# Altium PCB ePBR23_ACU_Power_rev0.PcbDoc (part 2 of 4)
Units mil, origin at the board's own origin, x right, y up, seen from the top; angles counter-clockwise.
Board outline 8165 x 3858 mil, 2 copper layers (Top Layer, Bottom Layer); 138 components, 121 nets, 515 pads, 2055 vias.
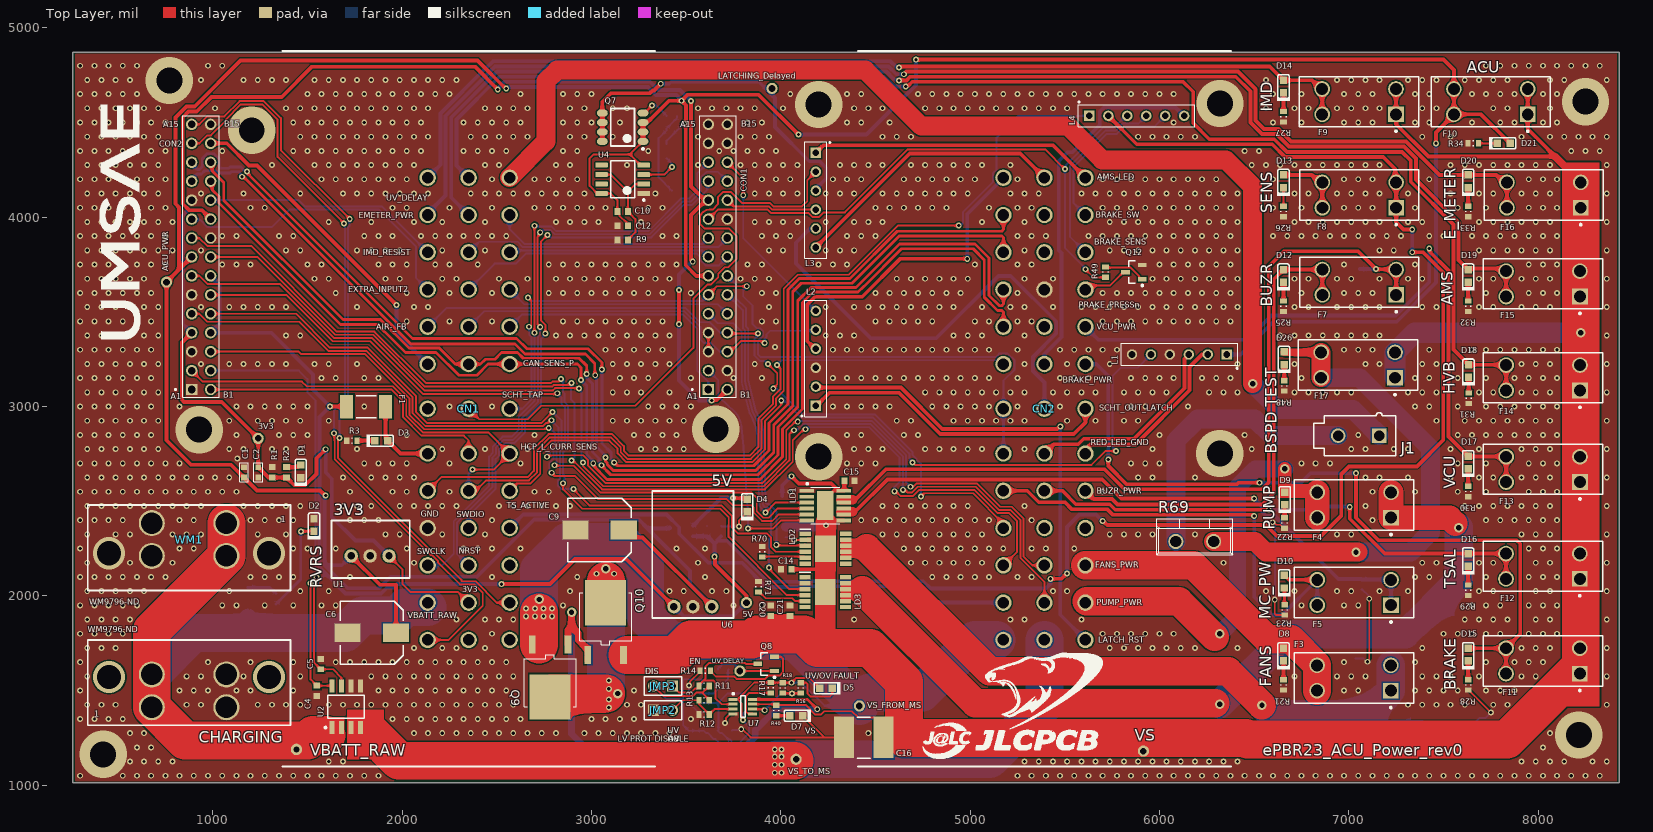
[diagram p0: Top Layer view]

## Via types
v1: diameter 31, hole 17, Top Layer to Bottom Layer, 2028 vias
v2: diameter 50, hole 28, Top Layer to Bottom Layer, 12 vias
v3: diameter 250, hole 137, Top Layer to Bottom Layer, 11 vias
v4: diameter 170, hole 128, Top Layer to Bottom Layer, 4 vias

## Nets (pads, with @x,y where several pads share a name; then routed paths per layer and width w, separated by ;. In a path a pad name is that pad's centre, name@x,y a point inside that pad or via, vN(x,y) a via of type N, cw(c..) or ccw(c..) an arc to the next point about the centre after c; other vN are vias at no path point) (continued)
5V: (continued)
  Top Layer w20: v1(1620,3000) F1.1@1707.05,3000 ; U2.8@1627.2,1549.69 1630,1546.89 U2.8@1630,1525.24 ; v1@2525,2063 2781.61,2063 2913.62,2195.01 3183.99,2195.01 U6.3@3436,1943 ; v1(3650.75,2207.11) 3652.86,2205.01 3652.86,2166.15 3818.72,2000.29 5V.1@3818.72,1964.38 ; v1(5425,2090) 5481.02,2090 5509.02,2118 v1(5512,2118) ; v1(5700,2395) 5702.98,2395 5723.98,2374 6562.75,2374 6619.75,2317 6853.01,2317 6960.5,2424.49 6960.5,2643.5 7000.5,2683.5 7359.5,2683.5 7499,2823 7499,3707.82 7391.82,3815 v1(7335,3815) ; L4.2@5730,4535 5880,4385 6595.45,4385 6662.45,4318 7182,4318 7244.8,4255.2 7244.8,4188.94 F8.2@7249.88,4183.86 F8.1@7249.88,4050 7249.88,3975.12 7289.5,3935.5 7334.5,3935.5 v1(7335,3935)
  Bottom Layer w10: v1(1517,2067) 1518.7,2068.7 1557.05,2068.7 1576.78,2088.43 1576.78,2097.98 1596.5,2117.7
  Bottom Layer w20: CON2.B7@989,3690 1036.12,3642.88 1036.12,3437.12 CON2.B4@989,3390 1310,3390 1530,3170 1530,3090 v1(1620,3000) 1564,2944 1564,2150.2 1596.5,2117.7 1701.2,2013 1890,2013 1919.57,2042.57 1953.25,2042.57 1967.61,2056.92 1972.69,2062 v1(2525,2062) ; U6.3@3436,1943 3488.43,1890.57 3744.91,1890.57 5V.1@3818.72,1964.38 ; R10.1@3535,2314.94 3611.97,2314.94 3650.75,2276.16 v1(3650.75,2207.11) ; 3650.75,2273.75 3668.52,2291.52 3716.77,2291.52 3933.79,2074.5 4141.04,2074.5 4144,2077.46 4752.83,2077.46 4790.73,2039.56 5399.56,2039.56 5425,2065 v1(5425,2090) ; 3665.02,2295.02 C13.2@3685,2315 ; v1(5512,2118) 5511.56,2118.44 5511.56,2364.56 5577,2430 5665,2430 v1(5700,2395) ; v1@7335,3814.77 v1(7335,3815) v1(7335,3935)
5V_ON: D4.1 R10.2 | length 344.5
  Top Layer w20: v1(3747.11,2517.5) 3749.21,2515.4 3818.72,2515.4 D4.1@3823.65,2510.46
  Bottom Layer w20: R10.2@3535,2370.06 3536.97,2370.06 3684.41,2517.5 v1@3739.02,2517.5
555_OUT: R41.1 U8.3 | length 234.6
  Bottom Layer w10: U8.3@3569.84,1484.65 U8.3@3585.2,1484.65 3645.87,1484.65 3720.98,1559.76 3720.98,1608.42 R41.1@3723.56,1611
555_OUT_LATCHING: Q11.1 R44.2 U4.3 | length 274
  Top Layer w10: U4.3@3276.22,4225 3385,4225 v1(3425,4265)
  Bottom Layer w10: Q11.1@3387.6,4229.29 3389.29,4229.29 v1(3425,4265) 3425,4282.44 R44.2@3397.44,4310
A\M\S\_\O\K\: CN1.20 L3.2 | length 3191.8
  Top Layer w10: CN1.20@2351.54,2988 2406.84,2932.69 2663.63,2932.69 2734.94,3004 3232.75,3004 3538.54,3309.79 3538.54,3570.09 3613.25,3644.8 3632.38,3644.8 3669.73,3682.15 3669.73,3701.28 3704,3735.55 3723.13,3735.55 3767,3779.42 3767,3900.58 3727.58,3940 3598.1,3940 3573.05,3965.05 3573.05,3996.05 ; 3573.05,3996.09 cw(c3583.05,3996.05) 3573.08,3996.77 cw(c3613.92,3993.69) 3584.97,4022.66 cw(c3627.15,3980.46) 3622.88,4039.98 cw(c3623.55,4030) 3623.55,4040 3640,4040 3668.45,4068.45 3668.45,4106.32 3694.25,4132.12 3737.88,4132.12 3796,4074 3944.08,4074 3961.08,4057 4112,4057 4140,4085 4140,4195 L3.2@4185,4240
ACU_PWR: ACU_PWR.1 C1.2 C6.1 C9.1 C10.2 C11.2 C12.2 CON1.A7 CON2.A8 D21.1 F10.3 F10.4 L1.1 Q7.1 Q7.2 Q7.3 R43.2 R45.2 U1.1 U4.4 U4.8 U6.1 | length 19666.8
  Top Layer w10: C12.2@3192.56,3955 3185.58,3961.98 3185.58,3971.42 3148.19,4008.81 3148.19,4017.28 3137.44,4028.03 C10.2@3137.44,4030 3137.44,4090.12 3102.56,4125 U4.8@3053.78,4125 3030,4125 2990,4165 2990,4310 3011.36,4331.36 3203.64,4331.36 ; Q7.1@3272.28,4400 3203.64,4331.36 ; U4.4@3276.22,4275 3260,4275 3203.64,4331.36
  Top Layer w20: CON2.A8@889,3790 822.5,3723.5 ; v1(1596.5,2530) 1593.52,2530 1566.56,2556.96 1233.04,2556.96 C1.2@1165,2625 1097,2693 885,2693 756,2822 ACU_PWR.1@756,3657 822.5,3723.5 ; U1.1@1731,2211 1883.42,2058.58 1967.95,2058.58 C6.1@1967.95,1805 ; v1(2550,4680) 2550,4675.96 2398.46,4827.5 1147.32,4827.5 904.82,4585 861.18,4585 802.82,4526.63 802.82,4071.37 822.5,4051.68 822.5,3723.5 ; C9.1@3170.91,2348 3210.12,2308.79 3270.21,2308.79 U6.1@3636,1943 ; Q7.1@3272.28,4400 Q7.2@3272.28,4450 Q7.3@3272.28,4500 3295,4500 3410,4615 v1(3475,4615) ; CON1.A7@3618.02,3690 3554.04,3690 3498,3746.04 3498,4487 v1(3490,4495) 3499,4504 3499,4591 v1(3475,4615) ; v1(4093,4436) 3882.5,4646.5 3507.85,4646.5 3476.35,4615 v1(3475,4615) ; v1(4714,4832) 7500,4832 7555.12,4776.88 F10.4@7555.12,4676.93 F10.3@7555.12,4543.07 ; v1(7460,4390) 7460,4447.95 F10.3@7555.12,4543.07 ; D21.1@7851.62,4390 7698.55,4543.07 F10.3@7555.12,4543.07
  Bottom Layer w10: R45.2@3397.44,4385 3397.44,4404.88 R43.2@3452.56,4460 3487.56,4495 v1(3490,4495)
  Bottom Layer w20: v1(1596.5,2530) 1596.5,2527.02 1591,2521.52 1591,2161.38 ; U1.1@1731,2211 1681.38,2161.38 1591,2161.38 ; v1(2550,4680) 2558,4688 3298.82,4688 3305.5,4681.32 3305.5,4680.35 3340.85,4645 3450,4645 v1@3475,4620 ; C11.2@3415,2358.08 3412.45,2360.63 3412.45,2358.45 3410,2356 3297,2356 ; U6.1@3636,1943 3636,1947 3520,2063 3520,2133 3297,2356 ; v1(4093,4436) 4451.96,4436 4714,4698.04 v1(4714,4832) ; L1.1@6355,3275 6429,3275 6602,3448 7253.18,3448 7460,3654.82 v1(7460,4390) ; 1591,2161.38 1712.38,2040 1878.82,2040 1939.74,2100.92 2396.2,2100.92 2698.28,2403 3250,2403 3297,2356
AIR+_CTRL: CN1.8 CON1.B9 | length 1420.9
  Bottom Layer w10: CN1.8@2351.54,3814.77 2406.84,3870.08 2609.92,3870.08 2638,3842 3670.02,3842 CON1.B9@3718.02,3890
AIR+_FB: CN1.12 CON1.B5 | length 1202.9
  Bottom Layer w10: CN1.12@2568.07,3617.92 2645.99,3540 3668.02,3540 CON1.B5@3718.02,3490